# Altium PCB DRIVER.PcbDoc (part 4 of 5)
Units mm, origin at the board's own origin, x right, y up, seen from the top; angles counter-clockwise.
Board outline 130 x 51 mm, 4 copper layers (SIG, GND_SIG, PWR, GND_PWR), stack 1.544 mm thick; 199 components, 147 nets, 682 pads, 359 vias.
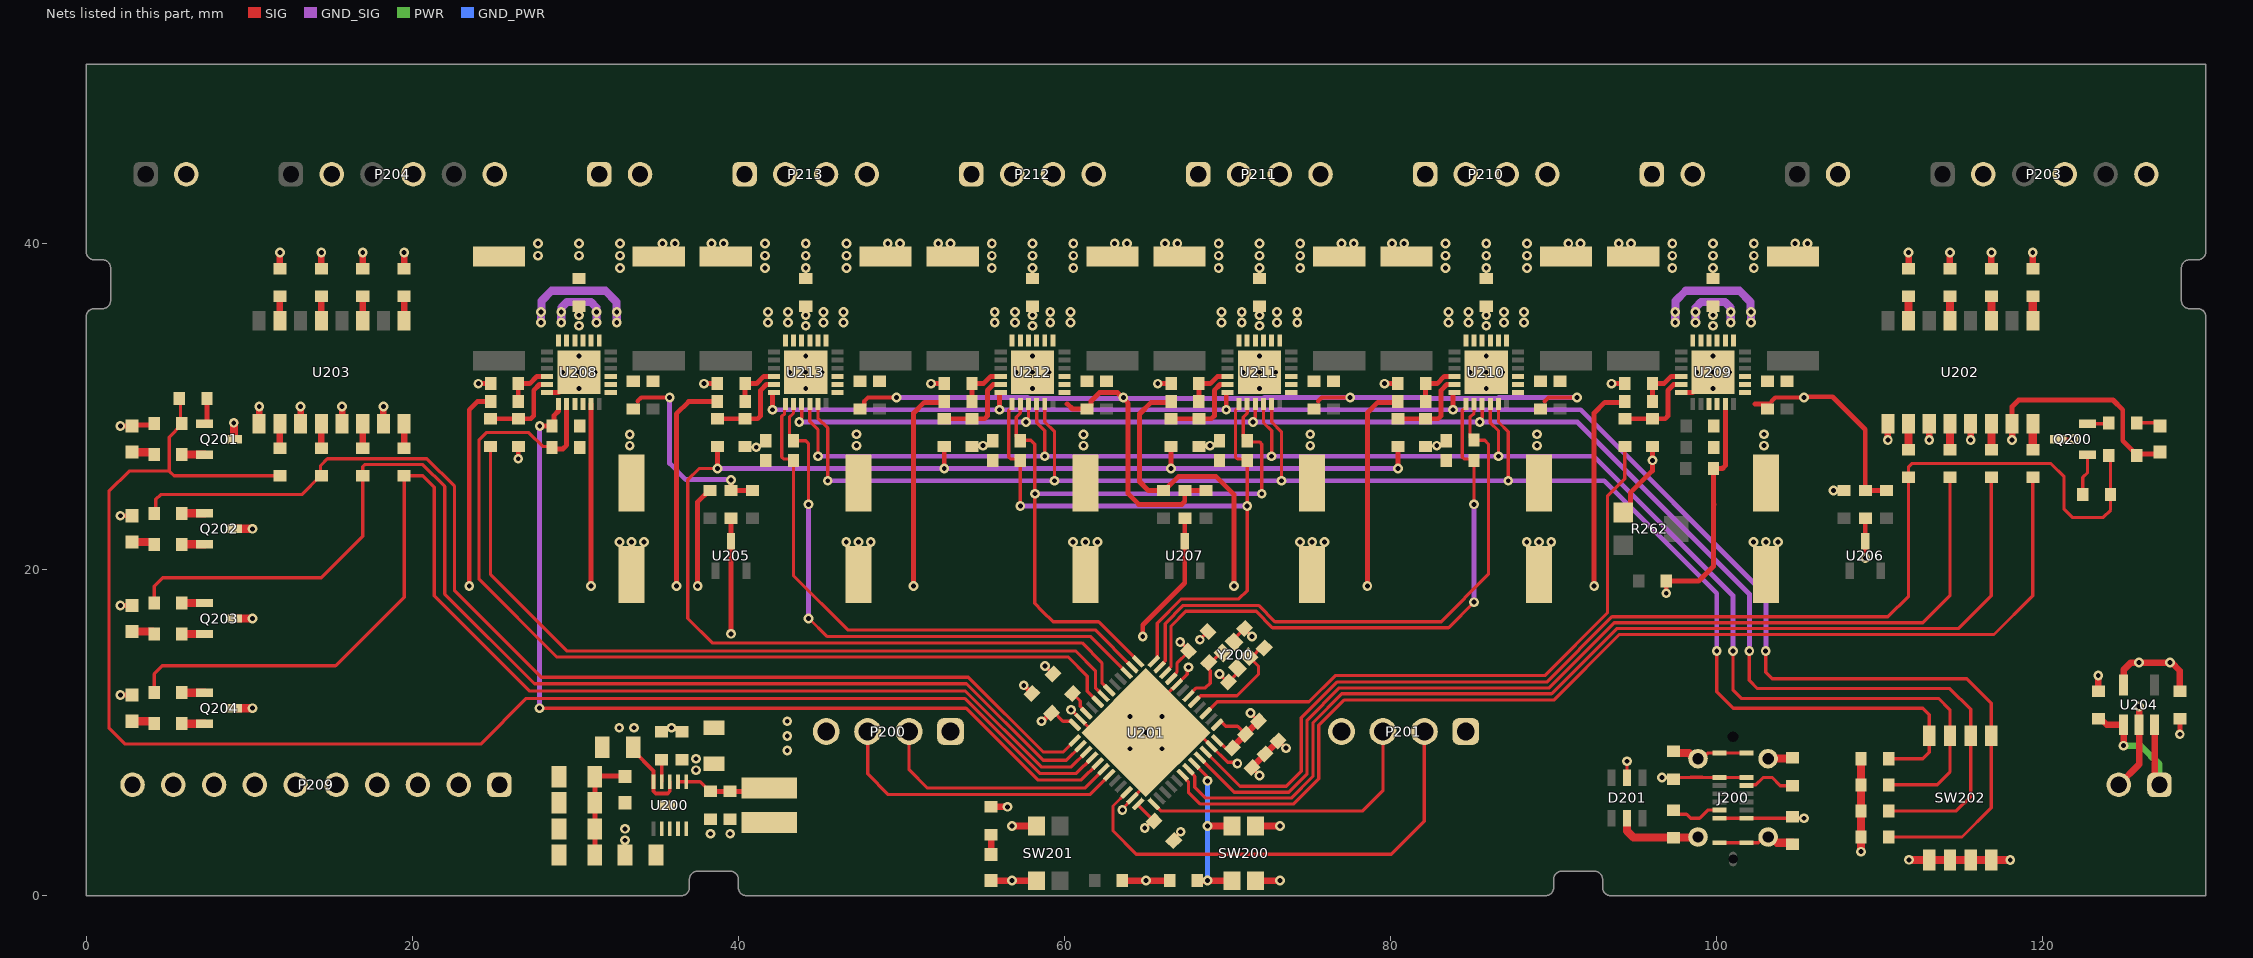
[diagram p4: the nets of this part, all layers, seen from the top]

## Via types
v1: diameter 0.6, hole 0.3, SIG to GND_PWR, tented both sides, 324 vias
v2: diameter 0.6, hole 0.3, SIG to GND_PWR, 35 vias

## Nets (pads, with @x,y where several pads share a name; then routed paths per layer and width w, separated by ;. In a path a pad name is that pad's centre, name@x,y a point inside that pad or via, vN(x,y) a via of type N, cw(c..) or ccw(c..) an arc to the next point about the centre after c; other vN are vias at no path point) (continued)
MCU_DIR_Y: (continued)
  SIG w0.203: R286.2@57.1,28.094 R286.2@57.294,27.9 57.046,28.148 57.046,28.316 57.044,28.317 57.044,29.35 57.294,29.6 U212.20@57.294,30.15 ; R286.2@57.294,27.934 57.944,27.934 58.178,27.7 58.178,17.922 58.65,17.45 ; R274.2@71.205,27.934 71.311,27.828 71.961,27.828 72.089,27.7 72.089,24.661 v1(72.1,24.65) ; U211.20@71.205,30.15 71.205,29.6 70.955,29.35 70.955,28.317 70.957,28.316 R274.2@70.957,28.148 ; R274.2@70.957,28.148 R274.2@71.205,27.9 R274.2@70.957,28.148
  GND_SIG w0.3: v1(58.2,24.65) v1(72.1,24.65)
MCU_DIR_Z: R288.2 U201.15 U213.20 | length 35.1
  SIG w0.2: v1(44.3,17) 44.334,17 45.434,15.9 61.575,15.9 U201.15@63.812,13.663
  SIG w0.203: U213.20@43.383,30.15 43.383,29.6 43.133,29.35 43.133,28.317 43.135,28.316 43.135,28.148 R288.2@43.383,27.9 44.133,27.9 44.3,27.733 v1(44.3,24)
  GND_SIG w0.3: v1(44.3,17) v1(44.3,24)
MCU_DOOR: R208.2 R214.2 R219.2 U201.46 | length 77.2
  SIG w0.2: U201.46@68.663,8.812 70.765,6.71 73.61,6.71 74.52,7.62 74.52,10.911 76.709,13.1 89.573,13.1 93.573,17.1 110.5,17.1 111.763,18.363 R219.2@111.763,25.65 111.763,26.3 111.963,26.5 120.5,26.5 121.3,25.7 121.3,23.7 121.8,23.2 123.7,23.2 124.15,23.65 R208.2@124.15,24.6 124.15,26.9 R214.2@124.05,27
MCU_DR_ENA: R270.2 R271.2 R284.2 R285.2 U201.18 | length 85.9
  SIG w0.2: v1(38.717,26.2) 37.6,26.2 36.9,25.5 36.9,17 38.4,15.5 61.078,15.5 62.3,14.278 62.3,13.054 U201.18@62.751,12.602
  SIG w0.3: v1@38.717,26.447 R285.2@38.717,27.55 ; v1(52.628,26.2) R284.2@52.628,27.55 ; v1@66.539,26.17 R271.2@66.539,27.55 ; v1@80.45,26.195 R270.2@80.45,27.55
  GND_SIG w0.3: v1(38.717,26.2) v1(52.628,26.2) v1(66.539,26.2) v1(80.45,26.2)
MCU_HOLD: R211.2 U201.43 | length 64.7
  SIG w0.2: U201.43@67.602,7.751 67.602,7.702 67.988,7.316 67.988,6.658 68.656,5.99 73.908,5.99 75.24,7.322 75.24,10.613 77.007,12.38 89.871,12.38 93.871,16.38 114.823,16.38 116.843,18.4 R211.2@116.843,25.65
MCU_LIM_X: R222.2 R228.2 U201.25 | length 70.1
  SIG w0.2: R222.2@4.176,23.45 4.276,23.55 4.276,24.307 4.568,24.6 13.227,24.6 14.377,25.75 14.377,26.377 14.8,26.8 20.9,26.8 22.6,25.1 22.6,18.7 25.8,15.5 27.9,13.4 54.1,13.4 58.688,8.812 59.923,8.812 U201.25@60.63,9.519
MCU_LIM_Y: R223.2 R226.2 U201.26 | length 75.2
  SIG w0.2: R223.2@4.176,17.95 4.176,18.976 4.7,19.5 14.434,19.5 16.967,22.033 R226.2@16.967,25.75 16.967,26.323 17.084,26.44 20.66,26.44 22,25.1 22,18.5 27.5,13 53.991,13 58.691,8.3 60.118,8.3 U201.26@60.984,9.166
MCU_LIM_Z: R221.2 R224.2 U201.27 | length 79.4
  SIG w0.2: R224.2@4.176,12.45 4.176,13.6 4.675,14.1 15.3,14.1 19.507,18.307 R221.2@19.507,25.75 20.65,25.75 21.35,25.05 21.35,18.4 27.2,12.55 53.932,12.55 58.582,7.9 60.425,7.9 U201.27@61.337,8.812
MCU_PROBE: R209.2 R215.2 R233.2 U201.28 | length 94.6
  SIG w0.2: R209.2@5.718,30.5 5.797,30.421 5.797,29.029 R215.2@5.876,28.95 5.876,28.9 5.1,28.124 5.1,26.043 ; R233.2@11.887,25.75 5.393,25.75 5.1,26.043 ; U201.28@61.691,8.459 60.732,7.5 58.473,7.5 53.873,12.1 27,12.1 24.2,9.3 2.4,9.3 1.4,10.3 1.4,24.8 2.643,26.043 5.1,26.043
MCU_SOFT_RST: R207.2 U201.42 | length 67.7
  SIG w0.2: U201.42@67.249,7.398 67.249,7.348 67.602,6.995 67.602,6.337 68.309,5.63 74.057,5.63 75.6,7.173 75.6,10.464 77.136,12 90,12 94.02,16.02 117.003,16.02 119.383,18.4 R207.2@119.383,25.65
MCU_SP_DIR: R258.2 U201.20 U208.20 | length 58.5
  SIG w0.2: R258.2@28.522,27.55 28,27.55 27.15,28.4 24.538,28.4 24.1,27.962 24.1,19.4 28.86,14.64 60.231,14.64 61.4,13.471 61.4,12.539 U201.20@62.044,11.895
  SIG w0.3: R258.2@28.672,27.4 29.245,27.4 29.472,27.627 U208.20@29.472,30.15
MCU_SP_ENA: R247.2 U201.19 | length 49.2
  SIG w0.2: R247.2@24.806,27.55 24.806,19.694 29.5,15 60.707,15 61.9,13.807 61.9,12.746 U201.19@62.398,12.249
MCU_SP_PWM: R257.2 U201.29 U208.19 | length 56.1
  SIG w0.2: v1(27.8,11.5) 53.964,11.5 58.364,7.1 61.039,7.1 U201.29@62.044,8.105
  SIG w0.3: v1@27.8,28.8 R257.2@28.572,28.8 28.702,28.93 28.702,29.457 28.972,29.727 U208.19@28.972,30.15
  GND_SIG w0.3: v1(27.8,11.5) v1@27.8,28.8
  other v1: 27.822,28.8
MCU_START: R213.2 U201.45 | length 61
  SIG w0.2: U201.45@68.309,8.459 70.418,6.35 73.759,6.35 74.88,7.471 74.88,10.762 76.858,12.74 89.722,12.74 93.722,16.74 112.643,16.74 114.303,18.4 R213.2@114.303,25.65
MCU_STP_X: R273.2 U201.10 U210.19 | length 35.9
  SIG w0.2: U201.10@66.188,13.663 66.188,13.712 66.535,14.059 66.535,16.54 67.435,17.44 71.756,17.44 72.756,16.44 83.556,16.44 v1(85.116,18) ; U210.19@84.616,30.15 84.616,29.925 84.566,29.875 84.517,29.875 84.4,29.758 84.4,26.9 84.517,26.783 85.033,26.783 R273.2@85.116,26.7 v1(85.116,24)
  GND_SIG w0.3: v1(85.116,18) v1(85.116,24)
MCU_STP_Y: R275.2 R287.2 U201.12 U211.19 U212.19 | length 41.7
  SIG w0.2: U212.19@56.794,30.15 56.794,29.925 56.744,29.875 56.695,29.875 56.578,29.758 56.578,26.9 56.695,26.783 57.211,26.783 R287.2@57.294,26.7 v1@57.294,24 ; U201.12@65.481,14.37 65.693,14.582 65.693,16.716 67.177,18.2 70.7,18.2 71.205,18.705 R275.2@71.205,26.7 71.122,26.783 70.606,26.783 70.489,26.9 70.489,29.758 70.606,29.875 70.655,29.875 70.705,29.925 U211.19@70.705,30.15
  GND_SIG w0.3: v1(57.294,23.9) v1(71.205,23.9)
MCU_STP_Z: R289.2 U201.14 U213.19 | length 34.3
  SIG w0.2: U213.19@42.833,30.1 42.833,29.561 42.667,29.395 42.667,26.9 42.784,26.783 43.3,26.783 R289.2@43.383,26.7 43.383,19.617 46.7,16.3 61.882,16.3 U201.14@64.166,14.016
MCU_SWCLK: P201.3 U201.37 | length 18.4
  SIG w0.2: U201.37@65.481,5.63 65.911,5.2 78.3,5.2 79.53,6.43 P201.3@79.53,10.07
MCU_SWDIO: P201.2 U201.34 | length 28.7
  SIG w0.2: U201.34@63.812,6.337 62.975,5.5 62.975,3.975 64.4,2.55 80.05,2.55 82.07,4.57 P201.2@82.07,10.07
MCU_UART_RX: P200.2 U201.30 | length 15.2
  SIG w0.2: P200.2@50.47,10.07 50.47,7.73 51.6,6.6 61.246,6.6 U201.30@62.398,7.751
MCU_UART_TX: P200.3 U201.31 | length 18.4
  SIG w0.2: P200.3@47.93,10.07 47.93,7.47 49.2,6.2 61.554,6.2 U201.31@62.751,7.398
MS1: R239.2 SW202.2 U210.21 U211.21 U212.21 U213.21 | length 98.1
  SIG w0.2: v1@43.733,28.9 v1@43.733,29.008 ; v1(43.733,29.05) 43.733,29.158 43.883,29.308 U213.21@43.883,30.15 ; v1@57.644,28.9 v1@57.644,29.008 ; v1(57.644,29.05) 57.644,29.158 57.794,29.308 U212.21@57.794,30.15 ; v1@71.555,28.9 v1@71.555,29.008 ; v1(71.555,29.05) 71.555,29.158 71.705,29.308 U211.21@71.705,30.15 ; v1@85.466,28.9 v1@85.466,29.008 ; v1(85.466,29.05) 85.466,29.158 85.616,29.308 U210.21@85.616,30.15 ; v1(102,15) 102,13.2 102.5,12.7 114.3,12.7 115.573,11.427 SW202.2@115.573,9.81 115.573,6.073 114.7,5.2 R239.2@110.55,5.2
  GND_SIG w0.3: v1(43.733,29.05) v1(57.644,29.05) v1(71.555,29.05) v1(85.466,29.05) 91.45,29.05 102,18.5 v1(102,15)
MS2: R238.2 SW202.3 U210.22 U211.22 U212.22 U213.22 | length 100.8
  SIG w0.2: U213.22@44.383,30.15 44.383,29.092 44.883,28.592 v1(44.883,26.95) ; U212.22@58.294,30.15 58.294,29.017 58.794,28.517 v1(58.794,26.95) ; U211.22@72.205,30.15 72.205,29.017 72.705,28.517 v1(72.705,26.95) ; U210.22@86.116,30.15 86.116,29.017 86.616,28.517 v1(86.616,26.95) ; v1(101,15) 101,12.6 101.5,12.1 113.6,12.1 114.303,11.397 SW202.3@114.303,9.81 114.303,7.58 113.523,6.8 R238.2@110.55,6.8
  GND_SIG w0.3: v1(44.883,26.95) v1(58.794,26.95) v1(72.705,26.95) v1(86.616,26.95) 92.45,26.95 101,18.4 v1(101,15)
MS3: R237.2 SW202.4 U210.23 U211.23 U212.23 U213.23 | length 101.8
  SIG w0.2: U213.23@44.883,30.15 44.883,29.284 45.483,28.684 v1(45.483,25.45) ; U212.23@58.794,30.15 58.794,29.052 59.394,28.452 v1(59.394,25.45) ; U211.23@72.705,30.15 72.705,29.052 73.305,28.452 v1(73.305,25.45) ; U210.23@86.616,30.15 86.616,29.052 87.216,28.452 v1(87.216,25.45) ; v1(100,15) 100,12.5 101,11.5 112.633,11.5 113.033,11.1 SW202.4@113.033,9.81 113.033,8.8 112.633,8.4 R237.2@110.55,8.4
  GND_SIG w0.3: v1(45.483,25.45) v1(59.394,25.45) v1(73.305,25.45) v1(87.216,25.45) 93.1,25.45 100,18.55 v1(100,15)
NetC205_2: C205.2 U200.3 U200.5 | length 4.9
  SIG w0.229: C205.2@33.55,9.1 33.55,8.9 34.8,7.65 U200.5@34.8,6.996 34.8,6.405 34.934,6.271 35.666,6.271 35.8,6.405 U200.3@35.8,6.996
NetC206_2: C206.2 U201.6 Y200.1 | length 4.1
  SIG w0.2: U201.6@67.602,12.249 68.094,12.74 68.64,12.74 68.932,13.032 68.932,13.795 68.813,13.915 68.813,14.268 C206.2@68.848,14.304 ; C206.2@68.995,14.304 Y200.1@69.562,14.871
  SIG w0.4: C206.2@68.848,14.304 C206.2@68.995,14.304 ; Y200.1@69.562,14.871 Y200.1@69.709,14.871
NetC207_2: C207.2 U201.5 Y200.3 | length 7.1
  SIG w0.2: U201.5@67.956,11.895 68.005,11.895 68.365,12.255 70.58,12.255 71.899,13.574 71.899,14.068 Y200.3@71.307,14.659 ; Y200.3@71.512,14.659 C207.2@72.045,15.192
  SIG w0.4: Y200.3@71.307,14.659 Y200.3@71.512,14.659 ; C207.2@72.045,15.192 C207.2@72.25,15.192
NetC209_2: C209.2 U201.22 | length 1.6
  SIG w0.2: C209.2@60.501,12.399 60.961,11.939 60.961,11.614 61.337,11.237 U201.22@61.337,11.188
NetC225_2: C225.2 R247.1 U208.17 | length 5.3
  SIG w0.3: R247.1@24.806,29.25 C225.2@26.506,29.25 27.28,29.25 27.456,29.426 27.456,31 27.806,31.35 U208.17@28.272,31.35
NetC226_2: C226.2 R248.1 U209.17 | length 5.3
  SIG w0.3: R248.1@94.361,29.25 96.835,29.25 97.011,29.426 97.011,31 97.361,31.35 U209.17@97.827,31.35
NetC227_2: C227.2 R249.1 U208.16 | length 3.1
  SIG w0.3: R249.1@26.506,30.3 C227.2@26.506,31.4 27.205,31.4 27.655,31.85 U208.16@28.272,31.85
NetC228_2: C228.2 R252.1 U209.16 | length 3.1
  SIG w0.3: R252.1@96.061,30.3 C228.2@96.061,31.4 96.76,31.4 97.21,31.85 U209.16@97.827,31.85
NetC235_2: C235.2 R268.1 U210.16 | length 3.1
  SIG w0.3: R268.1@82.15,30.3 C235.2@82.15,31.4 82.849,31.4 83.299,31.85 U210.16@83.916,31.85
NetC236_2: C236.2 R269.1 U211.16 | length 3.1
  SIG w0.3: R269.1@68.239,30.3 C236.2@68.239,31.4 68.938,31.4 69.388,31.85 U211.16@70.005,31.85
NetC237_2: C237.2 R270.1 U210.17 | length 5.3
  SIG w0.3: R270.1@80.45,29.25 82.924,29.25 83.1,29.426 83.1,31 83.45,31.35 U210.17@83.916,31.35
NetC238_2: C238.2 R271.1 U211.17 | length 5.3
  SIG w0.3: R271.1@66.539,29.25 69.013,29.25 69.189,29.426 69.189,31 69.539,31.35 U211.17@70.005,31.35
NetC245_2: C245.2 R282.1 U212.16 | length 3.1
  SIG w0.3: R282.1@54.328,30.3 C245.2@54.328,31.4 55.027,31.4 55.477,31.85 U212.16@56.094,31.85
NetC246_2: C246.2 R283.1 U213.16 | length 3.1
  SIG w0.3: R283.1@40.417,30.3 C246.2@40.417,31.4 41.116,31.4 41.566,31.85 U213.16@42.183,31.85
NetC247_2: C247.2 R284.1 U212.17 | length 5.3
  SIG w0.3: R284.1@52.628,29.25 55.102,29.25 55.278,29.426 55.278,31 55.628,31.35 U212.17@56.094,31.35
NetC248_2: C248.2 R285.1 U213.17 | length 5.3
  SIG w0.3: R285.1@38.717,29.25 41.191,29.25 41.367,29.426 41.367,31 41.717,31.35 U213.17@42.183,31.35
NetD200_2: D200.2 R201.1 | length 1.3
  SIG w0.4: D200.2@55.5,2.425 R201.1@55.5,3.75
NetD202_1: D202.1 R216.1 | length 1.5
  SIG w0.2: R216.1@125.75,29 126.974,29 D202.1@127.174,28.8
NetD203_1: D203.1 R217.1 | length 1.4
  SIG w0.5: D203.1@2.826,27.2 4.075,27.2 4.176,27.1 R217.1@4.176,27.05
NetD204_1: D204.1 R229.1 | length 1.4
  SIG w0.5: D204.1@2.826,21.7 4.075,21.7 4.176,21.6 R229.1@4.176,21.55
NetD205_1: D205.1 R230.1 | length 1.4
  SIG w0.5: D205.1@2.826,16.2 4.075,16.2 4.176,16.1 R230.1@4.176,16.05
NetD206_1: D206.1 R231.1 | length 1.4
  SIG w0.5: D206.1@2.826,10.7 4.075,10.7 4.176,10.6 R231.1@4.176,10.55
NetD207_1: D207.1 R264.1 R265.1 R266.1 R267.1 | length 6.4
  SIG w0.3: R264.1@31.2,2.5 R267.1@31.2,7.3 R267.1@31.25,7.35 ; R267.1@31.45,7.35 D207.1@33,7.35
NetJ200_A5: J200.A5 R205.2 | length 3.2
  SIG w0.2: J200.A5@101.83,6.75 101.88,6.8 102.4,6.8 102.85,7.25 103.4,7.25 103.9,6.75 R205.2@104.65,6.75
NetJ200_B5: J200.B5 R204.2 | length 3.2
  SIG w0.2: R204.2@97.35,5.25 97.6,5 98.15,5 98.4,4.75 98.95,4.75 99.45,5.25 J200.B5@100.17,5.25
NetL200_1: L200.1 U200.9
NetP207_1: P207.1 U208.7 U208.12 | length 7.8
  GND_SIG w0.5: v1(27.9,35.15) v1(27.9,35.8) 27.919,35.819 27.919,36.474 28.545,37.1 31.845,37.1 32.525,36.42 32.525,35.819 v1(32.544,35.8) v1(32.544,35.15)
NetP207_2: P207.2 U208.8 U208.11 | length 4.3
  GND_SIG w0.5: v1(29.139,35.15) v1(29.139,35.8) 29.158,35.819 29.158,36.076 29.482,36.4 30.962,36.4 31.286,36.076 31.286,35.819 v1(31.305,35.8) v1(31.305,35.15)
NetP208_1: P208.1 U209.7 U209.12 | length 7.8
  GND_SIG w0.5: v1(97.455,35.15) v1(97.455,35.8) 97.474,35.819 97.474,36.474 98.1,37.1 101.4,37.1 102.08,36.42 102.08,35.819 v1(102.099,35.8) v1(102.099,35.15)
NetP208_2: P208.2 U209.8 U209.11 | length 4.3
  GND_SIG w0.5: v1(98.694,35.15) v1(98.694,35.8) 98.713,35.819 98.713,36.076 99.037,36.4 100.517,36.4 100.841,36.076 100.841,35.819 v1(100.86,35.8) v1(100.86,35.15)
NetP210_1: P210.1 U210.12
  other v1: 83.544,35.15 83.544,35.8
NetP210_2: P210.2 U210.11
  other v1: 84.783,35.15 84.783,35.8
NetP210_3: P210.3 U210.8
  other v1: 86.949,35.15 86.949,35.8
NetP210_4: P210.4 U210.7
  other v1: 88.188,35.15 88.188,35.8
NetP211_1: P211.1 U211.12
  other v1: 69.633,35.15 69.633,35.8
NetP211_2: P211.2 U211.11
  other v1: 70.872,35.15 70.872,35.8
NetP211_3: P211.3 U211.8
  other v1: 73.038,35.15 73.038,35.8
NetP211_4: P211.4 U211.7
  other v1: 74.277,35.15 74.277,35.8
NetP212_1: P212.1 U212.12
  other v1: 55.722,35.15 55.722,35.8
NetP212_2: P212.2 U212.11
  other v1: 56.961,35.15 56.961,35.8
NetP212_3: P212.3 U212.8
  other v1: 59.127,35.15 59.127,35.8
NetP212_4: P212.4 U212.7
  other v1: 60.366,35.15 60.366,35.8
NetP213_1: P213.1 U213.12
  other v1: 41.811,35.15 41.811,35.8
NetP213_2: P213.2 U213.11
  other v1: 43.05,35.15 43.05,35.8
NetP213_3: P213.3 U213.8
  other v1: 45.216,35.15 45.216,35.8
NetP213_4: P213.4 U213.7
  other v1: 46.455,35.15 46.455,35.8
NetQ200_1: Q200.1 R208.1 | length 2.6
  SIG w0.2: R208.1@122.45,24.6 122.45,25.65 122.739,25.939 Q200.1@122.739,27.05
NetQ200_2: Q200.2 R216.2 | length 1.3
  SIG w0.2: Q200.2@122.739,28.95 124,28.95 R216.2@124.05,29
NetQ201_1: Q201.1 R209.1 | length 1.6
  SIG w0.3: Q201.1@7.26,28.95 7.314,28.95 7.418,29.054 R209.1@7.418,30.5
NetQ201_2: Q201.2 R217.2 | length 1.4
  SIG w0.5: R217.2@5.876,27.05 Q201.2@7.26,27.05
NetQ202_1: Q202.1 R222.1 | length 1.4
  SIG w0.5: R222.1@5.876,23.45 Q202.1@7.26,23.45
NetQ202_2: Q202.2 R229.2 | length 1.4
  SIG w0.5: R229.2@5.876,21.55 Q202.2@7.26,21.55
NetQ203_1: Q203.1 R223.1 | length 1.4
  SIG w0.5: R223.1@5.876,17.95 Q203.1@7.26,17.95
NetQ203_2: Q203.2 R230.2 | length 1.4
  SIG w0.5: R230.2@5.876,16.05 Q203.2@7.26,16.05
NetQ204_1: Q204.1 R224.1 | length 1.4
  SIG w0.5: R224.1@5.876,12.45 Q204.1@7.26,12.45
NetQ204_2: Q204.2 R231.2 | length 1.4
  SIG w0.5: R231.2@5.876,10.55 Q204.2@7.26,10.55
NetR203_1: R203.1 U200.4 | length 1.4
  SIG w0.229: U200.4@35.3,6.996 R203.1@35.3,8.35
NetR206_2: R206.2 U202.1 | length 1.5
  SIG w0.5: U202.1@119.383,35.25 R206.2@119.383,36.75
NetR207_1: R207.1 U202.16 | length 1.6
  SIG w0.5: R207.1@119.383,27.35 U202.16@119.383,28.95
NetR210_2: R210.2 U202.3 | length 1.5
  SIG w0.5: U202.3@116.843,35.25 R210.2@116.843,36.75
NetR211_1: R211.1 U202.14 | length 1.6
  SIG w0.5: R211.1@116.843,27.35 U202.14@116.843,28.95
NetR212_2: R212.2 U202.5 | length 1.5
  SIG w0.5: U202.5@114.303,35.25 R212.2@114.303,36.75
NetR213_1: R213.1 U202.12 | length 1.6
  SIG w0.5: R213.1@114.303,27.35 U202.12@114.303,28.95
NetR218_2: R218.2 U202.7 | length 1.5
  SIG w0.5: U202.7@111.763,35.25 R218.2@111.763,36.75
NetR219_1: R219.1 U202.10 | length 1.6
  SIG w0.5: R219.1@111.763,27.35 U202.10@111.763,28.95
NetR220_2: R220.2 U203.1 | length 1.5
  SIG w0.4: U203.1@19.507,35.25 R220.2@19.507,36.75
NetR221_1: R221.1 U203.16 | length 1.5
  SIG w0.4: R221.1@19.507,27.45 U203.16@19.507,28.95
NetR225_2: R225.2 U203.3 | length 1.5
  SIG w0.4: U203.3@16.967,35.25 R225.2@16.967,36.75
NetR226_1: R226.1 U203.14 | length 1.5
  SIG w0.4: R226.1@16.967,27.45 U203.14@16.967,28.95
NetR227_2: R227.2 U203.5 | length 1.5
  SIG w0.4: U203.5@14.427,35.25 R227.2@14.427,36.75
NetR228_1: R228.1 U203.12 | length 1.5
  SIG w0.4: R228.1@14.427,27.45 U203.12@14.427,28.95
NetR232_2: R232.2 U203.7 | length 1.5
  SIG w0.4: U203.7@11.887,35.25 R232.2@11.887,36.75
NetR233_1: R233.1 U203.10 | length 1.5
  SIG w0.4: R233.1@11.887,27.45 U203.10@11.887,28.95